# Altium PCB RVM_EF_PCB1.PcbDoc (part 1 of 2)
Units mm, origin at the board's own origin, x right, y up, seen from the top; angles counter-clockwise.
Board outline 100 x 100 mm, 2 copper layers (Top Layer, Bottom Layer); 92 components, 69 nets, 291 pads, 53 vias.
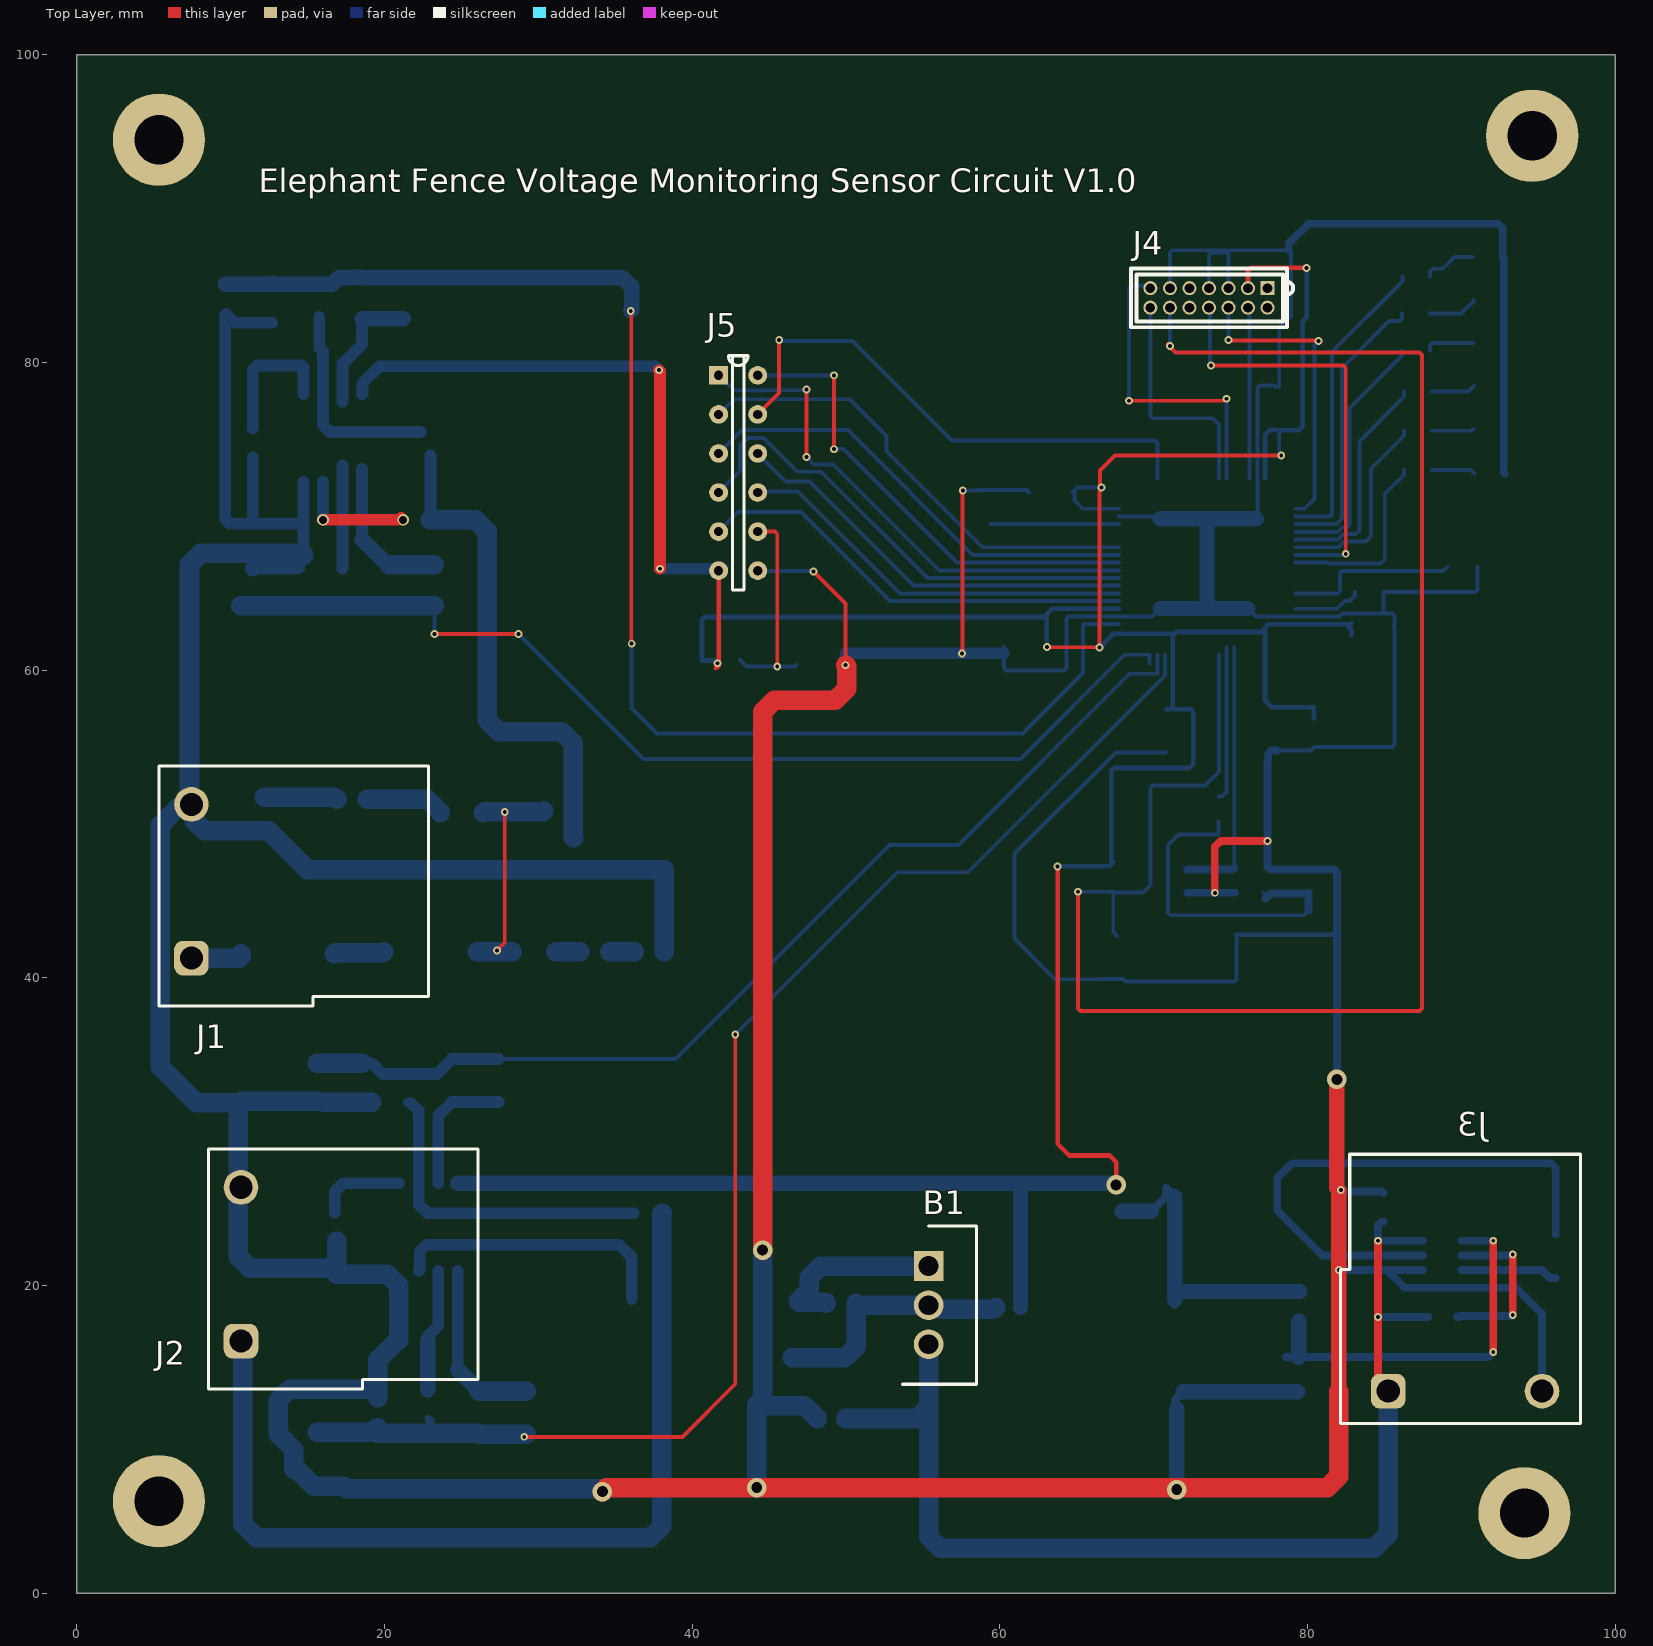
[diagram p0: Top Layer view]
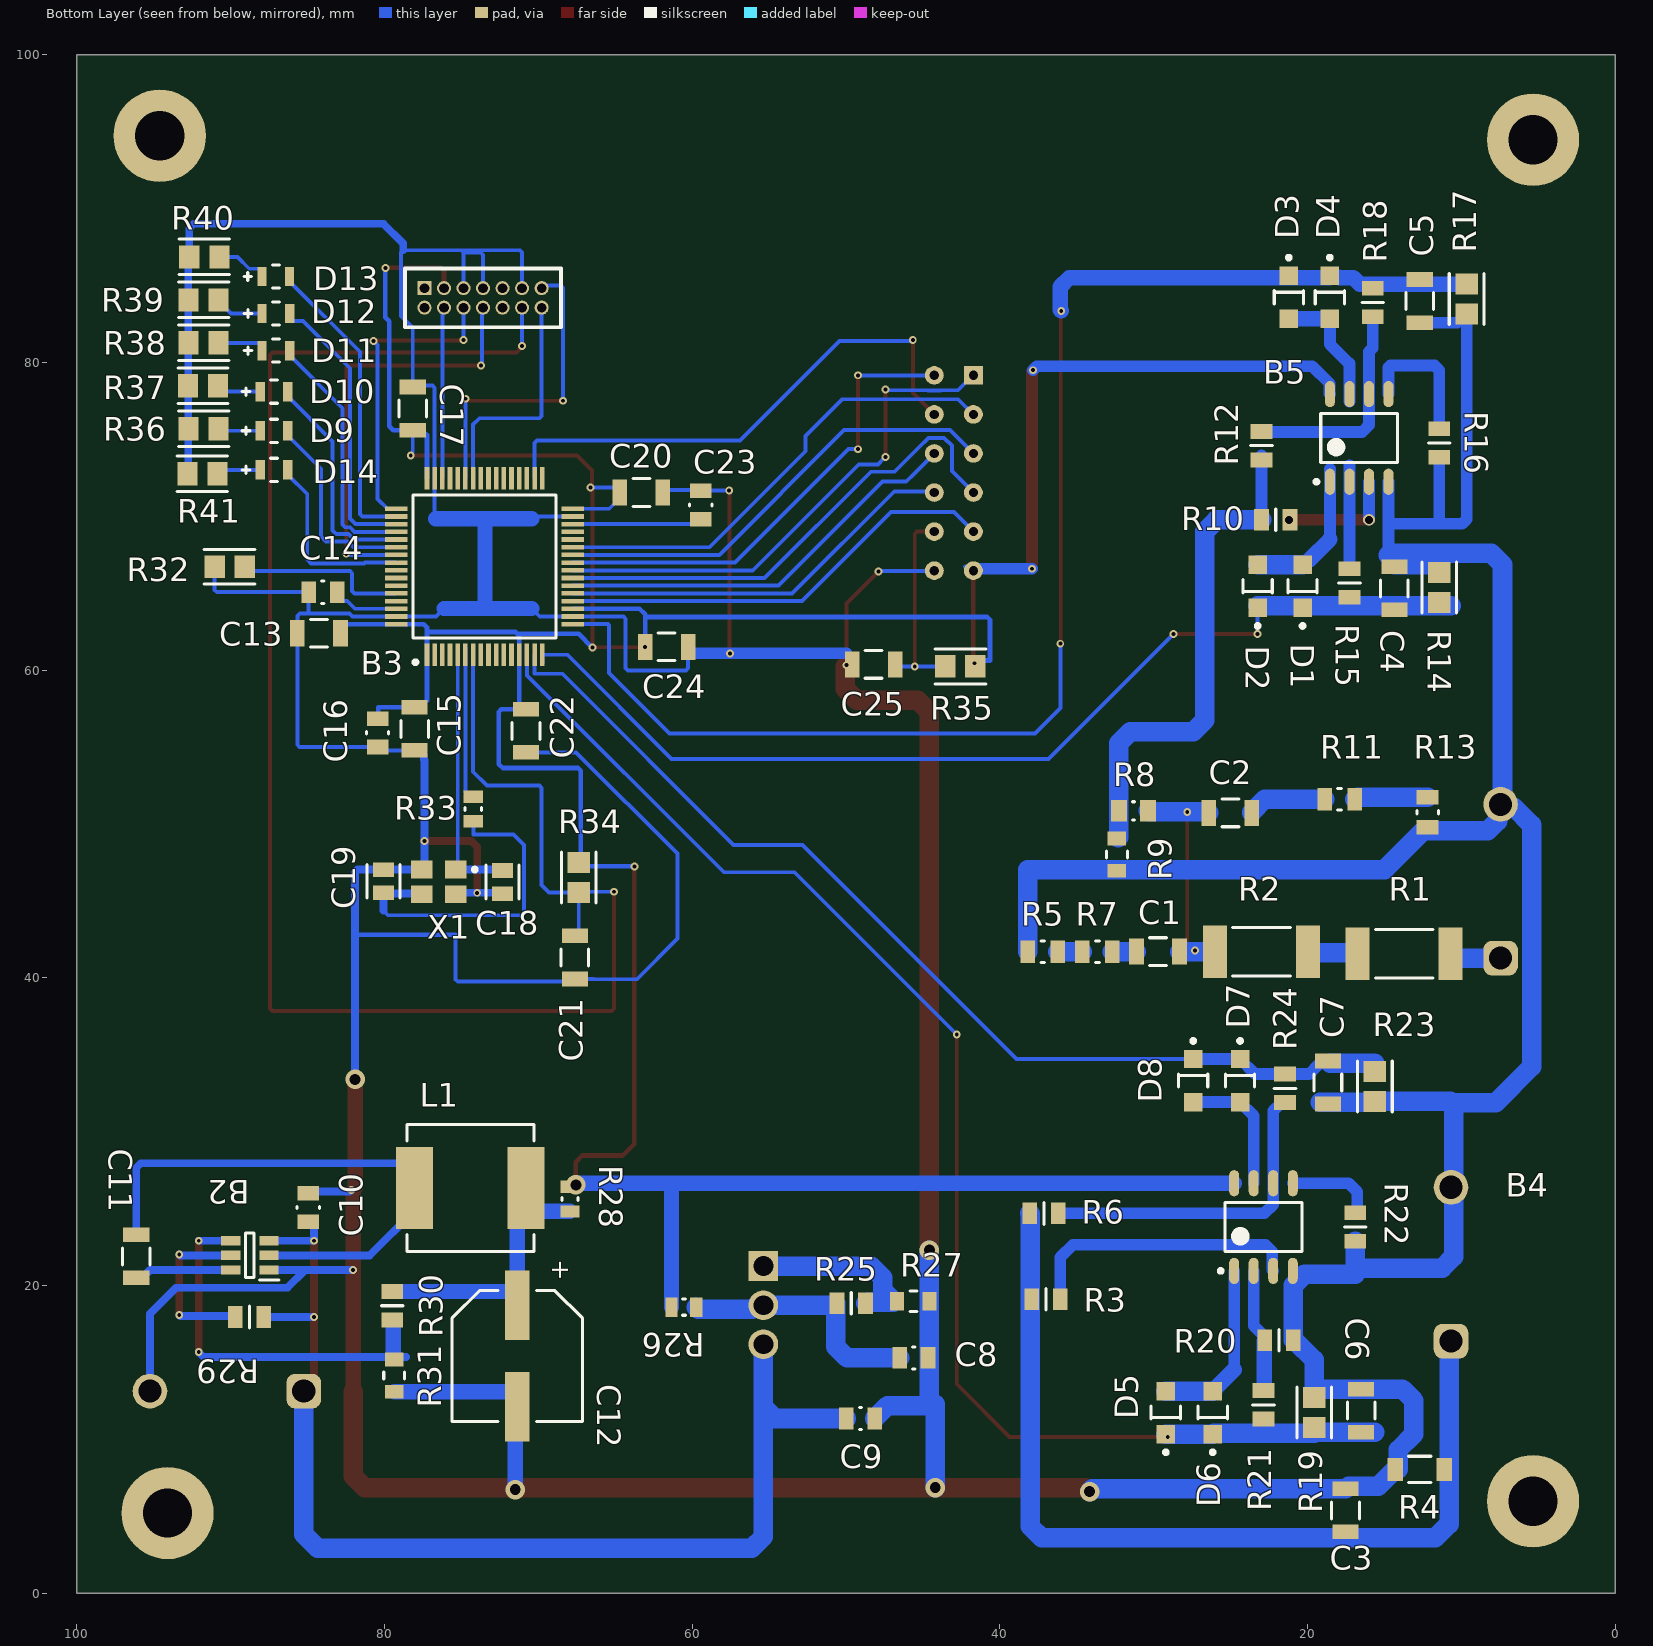
[diagram p1: Bottom Layer view, seen from below]
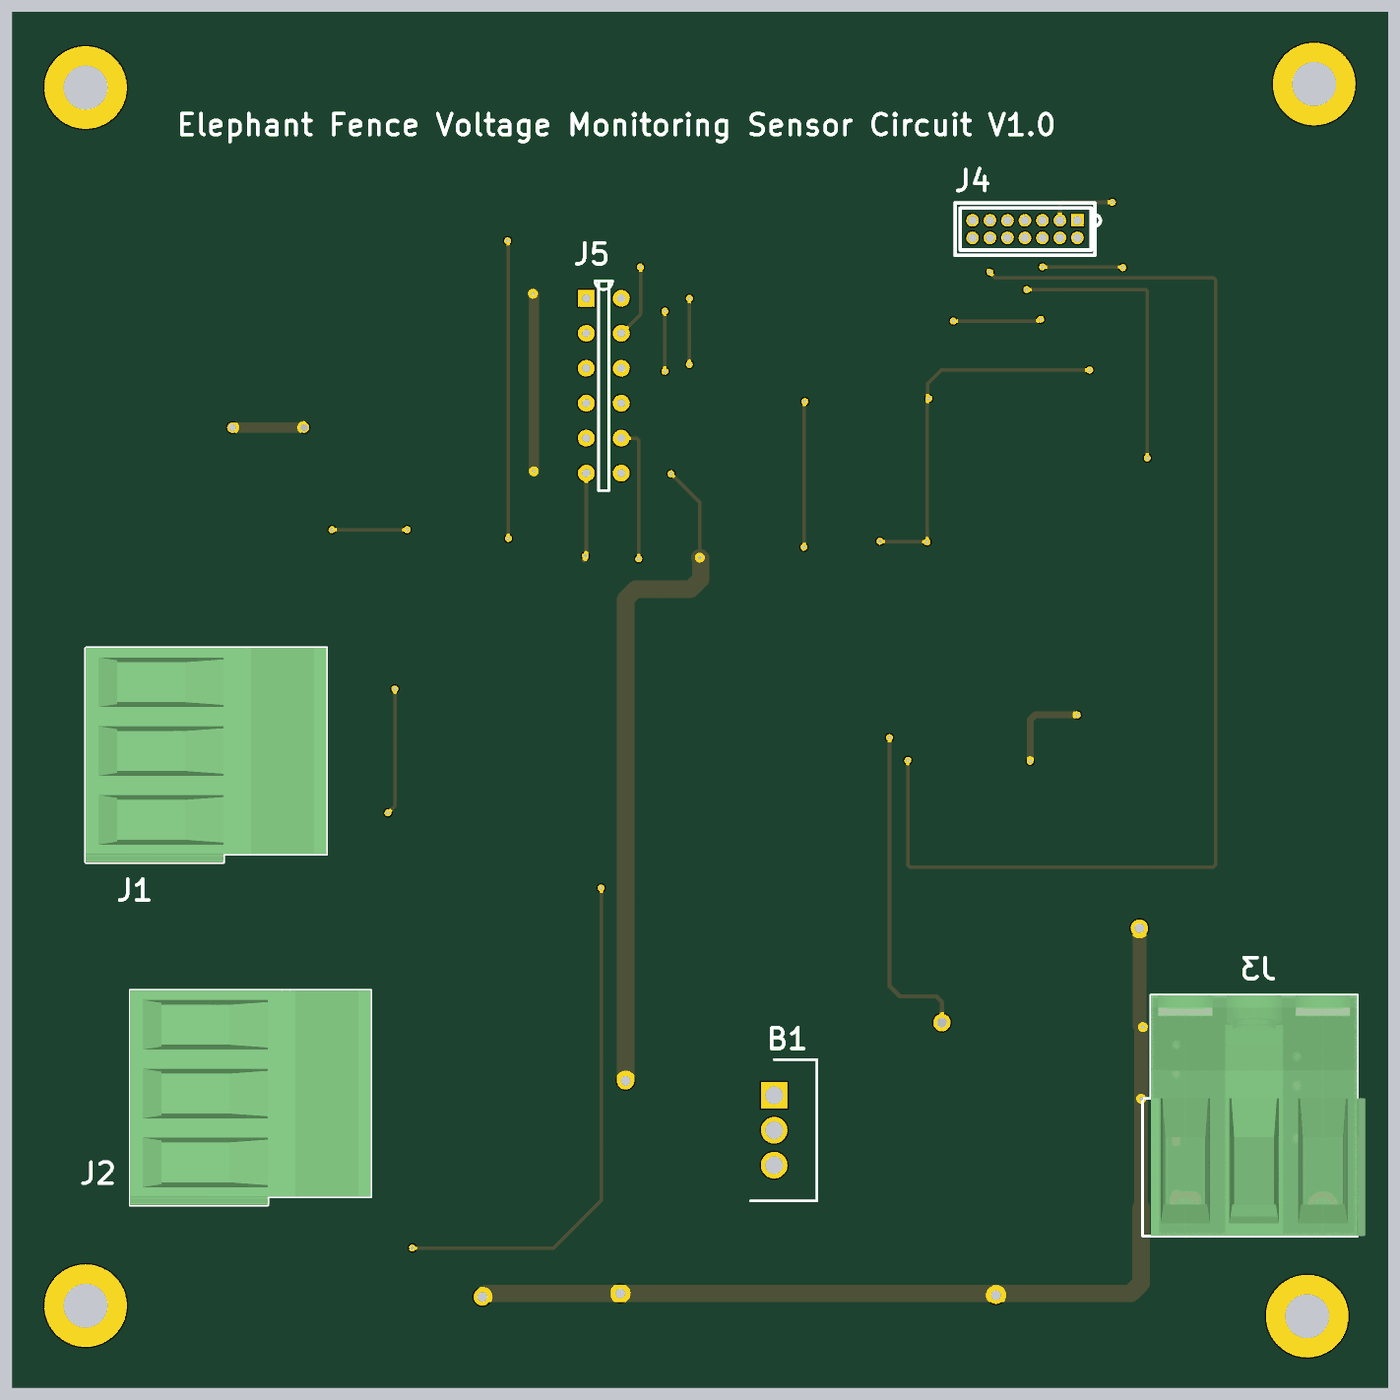
[diagram p2: 3D render of the assembled board from above, using the file's embedded part models]
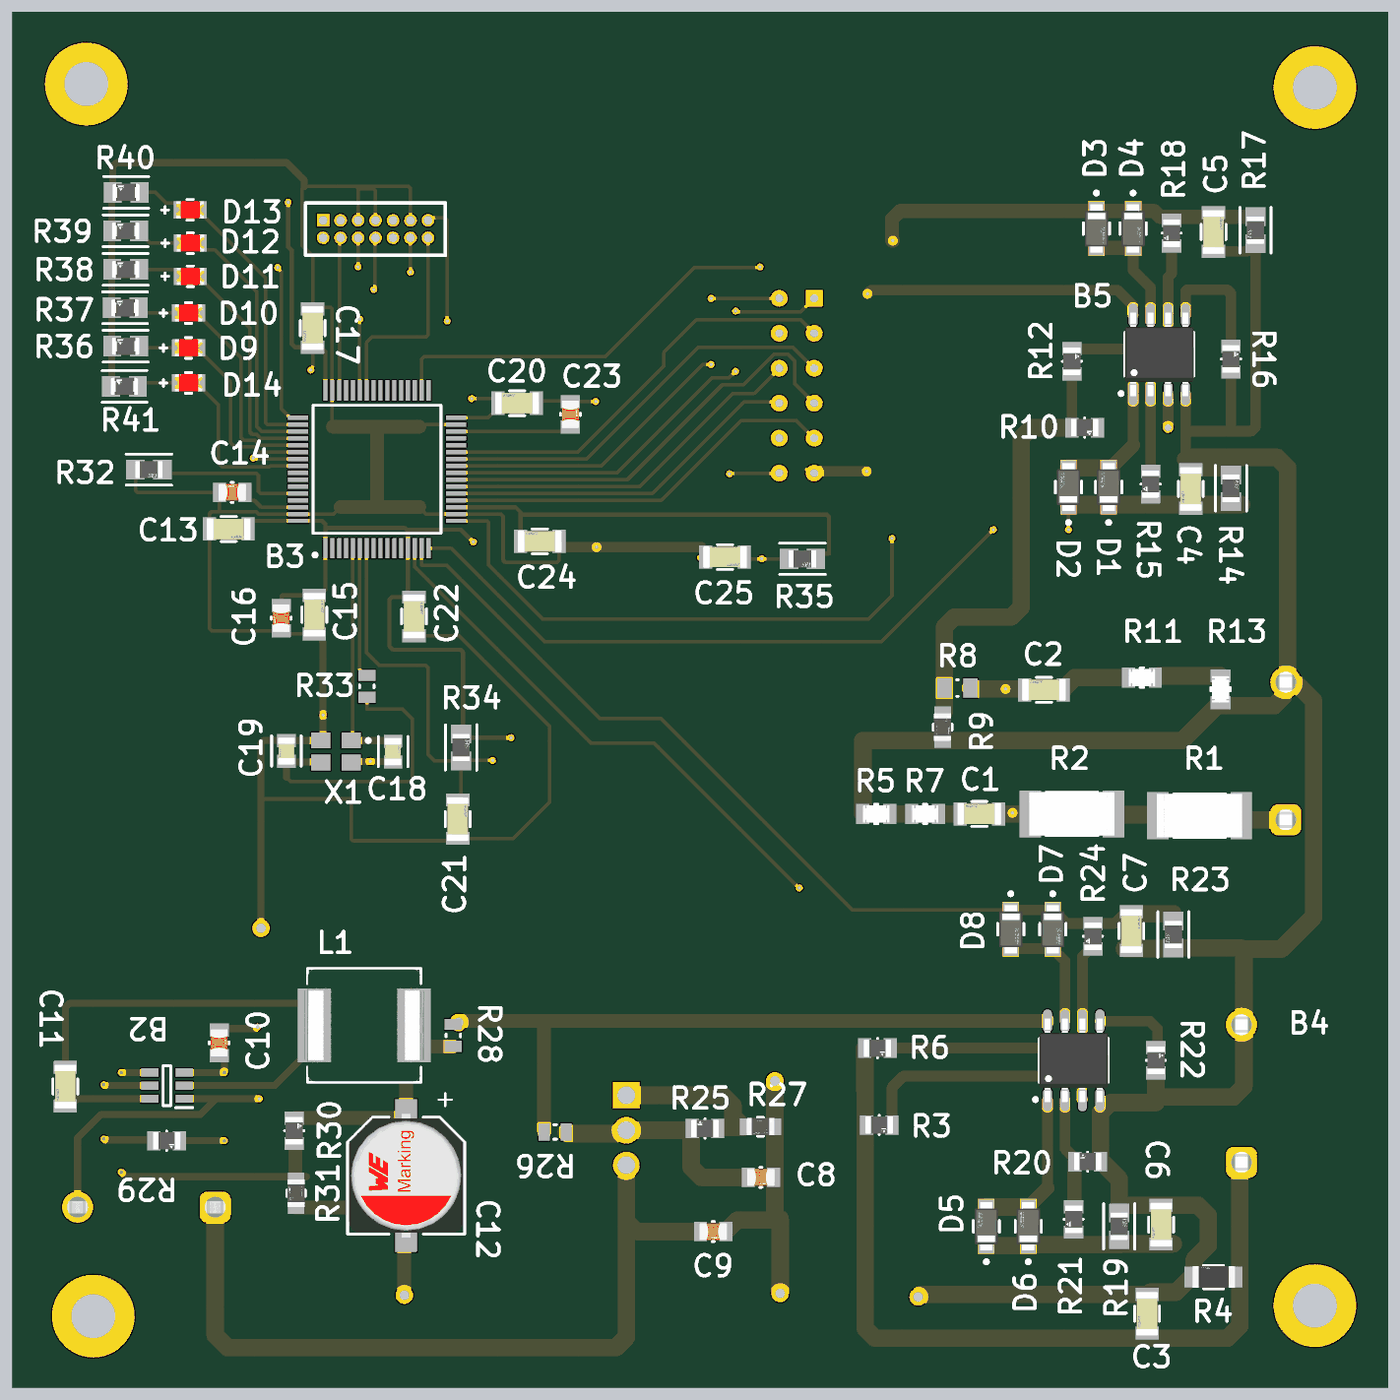
[diagram p3: 3D render of the assembled board from below, using the file's embedded part models]

## Layer stack, top to bottom
Top Solder: solder mask 0.0102, Solder Resist, Dk 3.5
Top Layer: signal copper 0.0356
Dielectric 1: dielectric 0.32, FR-4, Dk 4.8
Bottom Layer: signal copper 0.0356
Bottom Solder: solder mask 0.0102, Solder Resist, Dk 3.5

## Board outline
100,100 0,100 0,0 100,0

## Design rules (kind name [scope] priority, off if disabled: settings)
Clearance Clearance_B2 [HasFootprint('SOT95P280X110-6N')] p1: gap=0.127 ignorepadtopadclearanceinfootprint=FALSE
Clearance Clearance_Tight_Pitch_B3 [HasFootprint('QFP50P1200X1200X160-64N')] p2: gap=0.051 ignorepadtopadclearanceinfootprint=FALSE
Clearance [All] p3: gap=0.254 ignorepadtopadclearanceinfootprint=FALSE except(0.127: Arc-Arc Arc-Track Track-Track)
MinimumSolderMaskSliver [All] p1: minsoldermaskwidth=0.127
PolygonConnect [All] p1: connectstyle=Relief reliefconductorwidth=0.254 reliefentries=4 polygonreliefangle="90 Angle" airgapwidth=0.254
RoutingVias [All] p1: holewidth=0.711 width=1.27 viastyle="Through Hole" minholewidth=0.711 minwidth=1.27 maxholewidth=0.711 maxwidth=1.27
SilkToSolderMaskClearance [IsPad] p1: minsilkscreentomaskgap=0.127 clearancetoexposedcopper=TRUE
SolderMaskExpansion [All] p1: expansion=0.102 istentingtop=FALSE
SupplyNets "Schematic Supply Nets_1" [InNet('GND')] p1: voltage=0.000
SupplyNets "Schematic Supply Nets" [InNet('+3V3')] p2: voltage=0.000
Width [All] p1: maxlimit=1.27 minlimit=0.127 preferedwidth=0.508 minimp=50.000000 maximp=50.000000 favimp=50.000000
28 further rules are at their usual default settings.

## Classes and differential pairs
component class U_LED_blink: D9 D10 D11 D12 D13 D14 R36 R37 R38 R39 R40 R41

## Components (designator, comment, footprint, x,y, rotation, side; value= is the part's Value field where it differs from the comment)
B1 "LM317MBTG" TO254P482X997X2018-3P 55.372,21.257 r270 top
B2 "LMR51430YDDCR" SOT95P280X110-6N 88.753,21.958 r0 bottom
B3 "STM32H503RBT7" QFP50P1200X1200X160-64N 73.492,66.743 r90 bottom
B4 "TLV9002IDGKT" SOIC127P610X140-8M 22.86,23.797 r90 bottom
B5 "TLV9002IDGKT" SOIC127P610X140-8M 16.637,75.099 r90 bottom
C1 "C1206C104F3GACTU" FP-C1206C-EB-MFG 29.718,41.704 r180 bottom value="0.10 μF"
C2 "C1206C104F3GACTU" FP-C1206C-EB-MFG 25.019,50.721 r180 bottom value="0.10 μF"
C3 "C1206C104F3GACTU" FP-C1206C-EB-MFG 17.526,5.382 r90 bottom value="0.10 μF"
C4 "C1206C104F3GACTU" FP-C1206C-EB-MFG 14.351,65.323 r90 bottom value="0.10 μF"
C5 "C1206C104F3GACTU" FP-C1206C-EB-MFG 12.7,83.995 r270 bottom value="0.10 μF"
C6 "C1206C104F3GACTU" FP-C1206C-EB-MFG 16.51,11.859 r90 bottom value="0.10 μF"
C7 "C1206C104F3GACTU" FP-C1206C-EB-MFG 18.669,33.195 r270 bottom value="0.10 μF"
C8 "CC0805KKX7R9BB225" FP-CC0805-0_85-MFG 45.593,15.288 r180 bottom value="2.2 uF"
C9 "CC0805KKX7R9BB225" FP-CC0805-0_85-MFG 49.058,11.351 r180 bottom value="2.2 uF"
C10 "CC0805KKX7R9BB225" FP-CC0805-0_85-MFG 84.963,25.067 r90 bottom value="2.2 uF"
C11 "C1206C104F3GACTU" FP-C1206C-EB-MFG 96.139,21.892 r90 bottom value="0.10 μF"
C12 "865090449009" WCAP-ASLU_D8H6.5 71.374,15.415 r90 bottom
C13 "C1206C104F3GACTU" FP-C1206C-EB-MFG 84.264,62.405 r0 bottom value="0.10 μF"
C14 "CC0805KKX7R9BB225" FP-CC0805-0_85-MFG 84.01,65.072 r0 bottom value="2.2 uF"
C15 "C1206C104F3GACTU" FP-C1206C-EB-MFG 78.041,56.182 r270 bottom value="0.10 μF"
C16 "CC0805KKX7R9BB225" FP-CC0805-0_85-MFG 80.454,55.928 r270 bottom value="2.2 uF"
C17 "C1206C104F3GACTU" FP-C1206C-EB-MFG 78.168,77.01 r90 bottom value="0.10 μF"
C18 "C0805C100JAGACTU" FP-C0805C-DN-MFG 72.326,46.228 r270 bottom value="10 pF"
C19 "C0805C100JAGACTU" FP-C0805C-DN-MFG 80.073,46.276 r90 bottom value="10 pF"
C20 "C1206C104F3GACTU" FP-C1206C-EB-MFG 63.309,71.549 r180 bottom value="0.10 μF"
C21 "C1206C104F3GACTU" FP-C1206C-EB-MFG 67.627,41.323 r270 bottom value="0.10 μF"
C22 "C1206C104F3GACTU" FP-C1206C-EB-MFG 70.802,56.055 r270 bottom value="0.10 μF"
C23 "CC0805KKX7R9BB225" FP-CC0805-0_85-MFG 59.436,70.739 r90 bottom value="2.2 uF"
C24 "C1206C104F3GACTU" FP-C1206C-EB-MFG 61.658,61.516 r180 bottom value="0.10 μF"
C25 "C1206C104F3GACTU" FP-C1206C-EB-MFG 48.199,60.373 r0 bottom value="0.10 μF"
D1 "PMEG3010BER,115" FP-SOD123W-MFG 20.32,65.453 r90 bottom value=170pF
D2 "PMEG3010BER,115" FP-SOD123W-MFG 23.241,65.453 r90 bottom value=170pF
D3 "PMEG3010BER,115" FP-SOD123W-MFG 21.209,84.246 r270 bottom value=170pF
D4 "PMEG3010BER,115" FP-SOD123W-MFG 18.542,84.246 r270 bottom value=170pF
D5 "PMEG3010BER,115" FP-SOD123W-MFG 29.21,11.732 r90 bottom value=170pF
D6 "PMEG3010BER,115" FP-SOD123W-MFG 26.162,11.732 r90 bottom value=170pF
D7 "PMEG3010BER,115" FP-SOD123W-MFG 24.384,33.322 r270 bottom value=170pF
D8 "PMEG3010BER,115" FP-SOD123W-MFG 27.432,33.322 r270 bottom value=170pF
D9 "SML-LX0805SRC-TR" FP-SML-LX0805SRC-TR-MFG 87.185,75.565 r180 bottom
D10 "SML-LX0805SRC-TR" FP-SML-LX0805SRC-TR-MFG 87.185,78.105 r180 bottom
D11 "SML-LX0805SRC-TR" FP-SML-LX0805SRC-TR-MFG 87.058,80.772 r180 bottom
D12 "SML-LX0805SRC-TR" FP-SML-LX0805SRC-TR-MFG 87.058,83.185 r180 bottom
D13 "SML-LX0805SRC-TR" FP-SML-LX0805SRC-TR-MFG 87.069,85.598 r180 bottom
D14 "SML-LX0805SRC-TR" FP-SML-LX0805SRC-TR-MFG 87.185,73.025 r180 bottom
J1 "691252800002" 691252800002#1 14.097,46.276 r90 top
J2 "691252800002" 691252800002#1 17.318,21.383 r90 top
J3 "691252800002" 691252800002#2 90.25,19.779 r0 top
J4 "STDC-14 Conntector STM32" DIP14 77.406,84.836 r270 top
J5 "Component_1" DIP12-LoRa-Wireless-Maodule 41.719,79.169 r0 top
L1 "IHLP3232CZER5R6M01" FP-IHLP-3232CZ-FP_2_413x5-MFG 74.422,26.337 r0 bottom
R1 "CRCW251210M0FKEH" FP-CRCW2512-e3-IPC_A 13.716,41.577 r0 bottom
R2 "CRCW251210M0FKEH" FP-CRCW2512-e3-IPC_A 22.987,41.704 r0 bottom
R3 "MCU08050D1003BP500" FP-MCU0805-IPC_B 36.995,19.098 r180 bottom
R4 "RT1206FRE0747RL" FP-RT1206-MFG 12.7,8.049 r0 bottom value=47Ω
R5 "CRCW080510M0FKEC" FP-CRCW0805-e3-MFG 37.211,41.704 r0 bottom
R6 "MCU08050D1003BP500" FP-MCU0805-IPC_B 37.122,24.686 r180 bottom
R7 "CRCW080510M0FKEC" FP-CRCW0805-e3-MFG 33.655,41.704 r0 bottom
R8 "1M 1% 0805(2012)" RESC0805(2012)_N 31.308,50.848 r0 bottom value=1MR
R9 "RT0805DRD073K9L" FP-RT0805-MFG 32.385,48.006 r270 bottom value=3.9KΩ
R10 "MCU08050D1003BP500" FP-MCU0805-IPC_B 22.06,69.771 r180 bottom
R11 "CRCW080510M0FKEC" FP-CRCW0805-e3-MFG 17.907,51.61 r0 bottom
R12 "MCU08050D1003BP500" FP-MCU0805-IPC_B 22.987,74.597 r90 bottom
R13 "CRCW080510M0FKEC" FP-CRCW0805-e3-MFG 12.192,50.762 r90 bottom
R14 "RMCF0805FT1M00" FP-RMCF0805-IPC_A 11.43,65.366 r90 bottom
R15 "MCU08050D1003BP500" FP-MCU0805-IPC_B 17.272,65.669 r270 bottom
R16 "MCU08050D1003BP500" FP-MCU0805-IPC_B 11.43,74.762 r90 bottom
R17 "RMCF0805FT1M00" FP-RMCF0805-IPC_A 9.652,84.122 r270 bottom
R18 "MCU08050D1003BP500" FP-MCU0805-IPC_B 15.748,83.906 r270 bottom
R19 "RMCF0805FT1M00" FP-RMCF0805-IPC_A 19.558,11.732 r90 bottom
R20 "MCU08050D1003BP500" FP-MCU0805-IPC_B 21.844,16.431 r0 bottom
R21 "MCU08050D1003BP500" FP-MCU0805-IPC_B 22.86,12.24 r270 bottom
R22 "MCU08050D1003BP500" FP-MCU0805-IPC_B 16.891,23.797 r90 bottom
R23 "RMCF0805FT1M00" FP-RMCF0805-IPC_A 15.621,32.941 r270 bottom
R24 "MCU08050D1003BP500" FP-MCU0805-IPC_B 21.463,32.814 r270 bottom
R25 "MCU08050D1003BP500" FP-MCU0805-IPC_B 49.657,18.844 r0 bottom
R26 "RC0805JR-130RL" RESC2013X60X35LL10T20 60.541,18.59 r180 bottom value=0R
R27 "RT0805WRD0722K6L" FP-RT0805-MFG 45.627,18.971 r0 bottom value=22.6KΩ
R28 "RC0805JR-130RL" RESC2013X60X35LL10T20 67.945,25.613 r90 bottom value=0R
R29 "MCU08050D1003BP500" FP-MCU0805-IPC_B 88.773,17.955 r180 bottom
R30 "MCU08050D1003BP500" FP-MCU0805-IPC_B 79.502,18.679 r90 bottom
R31 "RT0805WRD0722K6L" FP-RT0805-MFG 79.375,14.145 r90 bottom value=22.6KΩ
R32 "RMCF0805FG10K0" FP-RMCF0805-IPC_A 90.066,66.723 r180 bottom
R33 "RC0805JR-130RL" RESC2013X60X35LL10T20 74.231,50.975 r270 bottom value=0R
R34 "RMCF0805FG10K0" FP-RMCF0805-IPC_A 67.373,46.53 r90 bottom
R35 "RMCF0805FG10K0" FP-RMCF0805-IPC_A 42.568,60.246 r180 bottom
R36 "CRCW0805300RFKEAHP" FP-CRCW0805-HPe3-IPC_A 91.757,75.692 r180 bottom
R37 "CRCW0805300RFKEAHP" FP-CRCW0805-HPe3-IPC_A 91.797,78.486 r180 bottom
R38 "CRCW0805300RFKEAHP" FP-CRCW0805-HPe3-IPC_A 91.757,81.28 r180 bottom
R39 "CRCW0805300RFKEAHP" FP-CRCW0805-HPe3-IPC_A 91.757,84.074 r180 bottom
R40 "CRCW0805300RFKEAHP" FP-CRCW0805-HPe3-IPC_A 91.718,86.868 r180 bottom
R41 "CRCW0805300RFKEAHP" FP-CRCW0805-HPe3-IPC_A 91.845,72.771 r180 bottom
X1 "TSX-3225 16.0000MF09Z-AC3" EPSON-TSX-3225_V 76.475,46.238 r0 bottom

## Footprints (in the part's own frame and the unit in brackets; to place one, negate y for a bottom-side part, rotate by r counter-clockwise, add the part's x,y. Pads: shape width x height; smd on the part's side, far side on the other; paste and mask are expansions set on the pad)
691252800002#1 [mm] "Serie 2528-10mm Vertical Cable Entry, 02p"
  rrect50% 2.25x2.25 hole 1.5: 1(-5,6.65)
  round 2.25 hole 1.5: 2(5,6.65)
  silkscreen extent -8.1,-8.75 7.5,8.75, body extent -8.1,-8.75 7.5,8.75, height 16.1
691252800002#2 [mm] "Serie 2528-10mm Vertical Cable Entry, 02p"
  rrect50% 2.25x2.25 hole 1.5: 1(-5,-6.65)
  round 2.25 hole 1.5: 2(5,-6.65)
  silkscreen extent -8.1,-8.75 7.5,8.75, body extent -7.5,-8.75 8.1,8.75, height 16.1
DIP12-LoRa-Wireless-Maodule [mm]
  rect 1.23x1.2 hole 0.6: 1(0,0)
  oval 1.23x1.2 hole 0.6: 2(0,-2.54) 3(0,-5.08) 4(0,-7.62) 5(0,-10.16) 6(0,-12.7) 7(2.54,-12.7) 8(2.54,-10.16) 9(2.54,-7.62) 10(2.54,-5.08) 11(2.54,-2.54) 12(2.54,0)
  silkscreen extent 0.64,-13.97 1.91,1.27
DIP14 [mil]
  rect 36x36 hole 25: 1(0,0)
  round 36 hole 25: 2(50,0) 3(0,-50) 4(50,-50) 5(0,-100) 6(50,-100) 7(0,-150) 8(50,-150) 9(0,-200) 10(50,-200) 11(0,-250) 12(50,-250) 13(0,-300) 14(50,-300)
  silkscreen extent -50,-350 100,66
EPSON-TSX-3225_V [mm] "SMD, 4-Leads, Body 3.2x2.5mm"
  rect 1.4x1.15 smd: 1(-1.1,-0.8) 2(1.1,-0.8) 3(1.1,0.8) 4(-1.1,0.8)
  silkscreen extent -2.47,-0.92 -2.22,-0.68, body extent -1.6,-1.25 1.6,1.25, height 0.6
FP-C0805C-DN-MFG [mm]
  rect 0.95x1.35 smd paste+0 mask+0: 1(-0.75,0) 2(0.75,0)
  silkscreen extent -1.1,-1.07 1.1,1.07, body extent -1,-0.63 1,0.63, height 0.88
FP-C1206C-EB-MFG [mm]
  rect 0.95x1.7 smd paste+0 mask+0: 1(-1.4,0) 2(1.4,0)
  silkscreen extent -0.55,-0.9 0.55,0.9, body extent -1.6,-0.8 1.6,0.8, height 0.88
FP-CC0805-0_85-MFG [mm]
  rect 0.95x1.4 smd paste+0 mask+0: 1(-0.925,0) 2(0.925,0)
  silkscreen extent -0.07,-0.73 0.07,0.73, body extent -1,-0.63 1,0.63, height 0.95
FP-CRCW0805-e3-MFG [mm]
  rect 0.95x1.45 smd paste+0 mask+0: 1(-0.975,0) 2(0.975,0)
  silkscreen extent -0.13,-0.7 0.13,0.7, body extent -1,-0.63 1,0.63, height 0.5
FP-CRCW0805-HPe3-IPC_A [mm]
  rect 1.306x1.508 smd paste+0 mask+0: 1(-0.976,0) 2(0.976,0)
  silkscreen extent -1.63,-1.15 1.63,1.15, body extent -1,-0.63 1,0.63, height 0.6
FP-CRCW2512-e3-IPC_A [mm]
  rect 1.555x3.408 smd paste+0 mask+0: 1(-3.026,0) 2(3.026,0)
  silkscreen extent -1.87,-1.58 1.87,1.58, body extent -3.15,-1.58 3.15,1.58, height 0.7
FP-IHLP-3232CZ-FP_2_413x5-MFG [mil]
  rect 95x210 smd paste+0 mask+0: 1(-142.5,0) 2(142.5,0)
  silkscreen extent -163,-163 163,163, body extent -170,-161 170,161, height 118
FP-MCU0805-IPC_B [mm]
  rect 0.959x1.408 smd paste+0 mask+0: 1(-0.927,0) 2(0.927,0)
  silkscreen extent 0,-0.7 0,0.7, body extent -1,-0.63 1,0.63, height 0.55
FP-RMCF0805-IPC_A [mm]
  rect 1.355x1.462 smd paste+0 mask+0: 1(-0.976,0) 2(0.976,0)
  silkscreen extent -1.65,-1.13 1.65,1.13, body extent -1,-0.63 1,0.63, height 0.65
FP-RT0805-MFG [mm]
  rect 0.9x1.2 smd paste+0 mask+0: 1(-1.05,0) 2(1.05,0)
  silkscreen extent -0.22,-0.67 0.22,0.67, body extent -1,-0.63 1,0.63, height 0.6
FP-RT1206-MFG [mm]
  rect 1x1.5 smd paste+0 mask+0: 1(-1.6,0) 2(1.6,0)
  silkscreen extent -0.73,-0.85 0.73,0.85, body extent -1.57,-0.8 1.53,0.8, height 0.65
FP-SML-LX0805SRC-TR-MFG [mm]
  rect 0.6x1.25 smd paste+0 mask+0: 1(-0.9,0) 2(0.9,0)
  silkscreen extent -2.07,-0.75 0.22,0.75, body extent -1,-0.63 1.01,0.63, height 1.24
FP-SOD123W-MFG [mm]
  rect 1.2x1.2 smd paste-1000 mask+0: 1(-1.4,0) 2(1.4,0)
  silkscreen extent -2.7,-0.95 0.42,0.95, body extent -1.75,-0.85 1.75,0.85, height 1.1
QFP50P1200X1200X160-64N [mm]
  rect 1.475x0.3 smd: 1(-5.738,3.75) 2(-5.738,3.25) 3(-5.738,2.75) 4(-5.738,2.25) 5(-5.738,1.75) 6(-5.738,1.25) 7(-5.738,0.75) 8(-5.738,0.25) 9(-5.738,-0.25) 10(-5.738,-0.75) 11(-5.738,-1.25) 12(-5.738,-1.75) 13(-5.738,-2.25) 14(-5.738,-2.75) 15(-5.738,-3.25) 16(-5.738,-3.75) 33(5.738,-3.75) 34(5.738,-3.25) 35(5.738,-2.75) 36(5.738,-2.25) 37(5.738,-1.75) 38(5.738,-1.25) 39(5.738,-0.75) 40(5.738,-0.25) 41(5.738,0.25) 42(5.738,0.75) 43(5.738,1.25) 44(5.738,1.75) 45(5.738,2.25) 46(5.738,2.75) 47(5.738,3.25) 48(5.738,3.75)
  rect 0.3x1.475 smd: 17(-3.75,-5.738) 18(-3.25,-5.738) 19(-2.75,-5.738) 20(-2.25,-5.738) 21(-1.75,-5.738) 22(-1.25,-5.738) 23(-0.75,-5.738) 24(-0.25,-5.738) 25(0.25,-5.738) 26(0.75,-5.738) 27(1.25,-5.738) 28(1.75,-5.738) 29(2.25,-5.738) 30(2.75,-5.738) 31(3.25,-5.738) 32(3.75,-5.738) 49(3.75,5.738) 50(3.25,5.738) 51(2.75,5.738) 52(2.25,5.738) 53(1.75,5.738) 54(1.25,5.738) 55(0.75,5.738) 56(0.25,5.738) 57(-0.25,5.738) 58(-0.75,5.738) 59(-1.25,5.738) 60(-1.75,5.738) 61(-2.25,5.738) 62(-2.75,5.738) 63(-3.25,5.738) 64(-3.75,5.738)
  silkscreen extent -6.35,-4.65 4.65,4.65
RESC0805(2012)_N [mm] "Chip Resistor, Body 2.0x1.3mm, IPC Medium Density"
  rect 1.05x1.4 smd: 1(-0.95,0) 2(0.95,0)
  silkscreen extent -0.05,-0.6 0.05,0.6, body extent -1.1,-0.67 1.1,0.68, height 0.7
RESC2013X60X35LL10T20 [mm] "Chip Resistor, 2-Leads, Body 2.00x1.25mm, IPC High Density"
  rect 0.8x1.25 smd: 1(-0.8,0) 2(0.8,0)
  silkscreen extent -0.1,-0.53 0.1,0.53, body extent -1.05,-0.67 1.05,0.67, height 0.6
SOIC127P610X140-8M [mm] "SOIC, 8-Leads, Body 4.95x3.95mm, Pitch 1.27mm, IPC Low Density"
  oval 1.7x0.65 smd: 1(-2.85,1.905) 2(-2.85,0.635) 3(-2.85,-0.635) 4(-2.85,-1.905) 5(2.85,-1.905) 6(2.85,-0.635) 7(2.85,0.635) 8(2.85,1.905)
  silkscreen extent -2.97,-2.5 1.6,2.91, body extent -3.05,-2.5 3.05,2.5, height 1.4
SOT95P280X110-6N [mm]
  rect 1.25x0.6 smd: 1(-1.25,0.95) 2(-1.25,0) 3(-1.25,-0.95) 4(1.25,-0.95) 5(1.25,0) 6(1.25,0.95)
  silkscreen extent -1.87,-1.45 0.28,1.6
TO254P482X997X2018-3P [mm]
  rect 1.935x1.935 / inner round 1.935 / far side rect 1.935x1.935 hole 1.29: 1(0,0)
  round 1.935 hole 1.29: 2(2.54,0) 3(5.08,0)
  silkscreen extent -2.6,-1.71 7.68,3.11
WCAP-ASLU_D8H6.5 [mm] "Aluminum Electrolytic Capacitors, body diameter 8mm"
  rect 4.5x1.6 smd: 1(3.3,0) 2(-3.3,0)
  silkscreen extent -4.25,-4.25 4.25,4.25, body extent -4.5,-4.15 4.5,4.15, height 6.49

## Part data
B1: "Internal Short Circuit Current Limiting; Internal Thermal Overload Protection; Output Current in Excess of 500 mA; Output Transistor Safe-Area Compensation; Output Adjustable between 1.2 V and 37 V; Floating Operation for High Voltage Applications; Eliminates Stocking Many Fixed Voltages; Pb-Free Packages are Available; NCV Prefix for Automotive and Other Applications Requiring Site Control Changes", Manufacturer_Name=onsemi, Mouser Part Number=863-LM317MBTG, Datasheet Link=https://www.onsemi.com/pub/Collateral/LM317M-D.PDF, Geometry.Height=4.82mm, Manufacturer_Part_Number=LM317MBTG, Mouser Price/Stock=https://www.mouser.co.uk/ProductDetail/onsemi/LM317MBTG?qs=2OtswVQKCOHWWQM%252BNYhxOw%3D%3D
B2: "Switching Voltage Regulators SIMPLE SWITCHER&reg; 4.5-V to 36-V, 3-A synchronous buck converter with 40-&micro;A IQ", Manufacturer_Name="Texas Instruments", Mouser Part Number=595-LMR51430YDDCR, Datasheet Link=https://www.ti.com/lit/ds/symlink/lmr51430.pdf?ts=1657817980313&ref_url=https%253A%252F%252Fwww.ti.com%252Fproduct%252FLMR51430%253FkeyMatch%253DLMR51430%2526tisearch%253Dsearch-everything%2526usecase%253DGPN, Geometry.Height=1.1mm, Manufacturer_Part_Number=LMR51430YDDCR, Mouser Price/Stock=https://www.mouser.co.uk/ProductDetail/Texas-Instruments/LMR51430YDDCR?qs=vvQtp7zwQdMdLcsY5sFiMg%3D%3D
B3: "Arm Cortex-M33 32-bit MCU+FPU, 375 DMIPS, 250 MHz, 128 Kbytes flash memory, 32 Kbytes RAM, I3C", Manufacturer_Name=STMicroelectronics, Mouser Part Number=511-STM32H503RBT7, Datasheet Link=https://www.st.com/resource/en/datasheet/stm32h503eb.pdf, Geometry.Height=1.6mm, Manufacturer_Part_Number=STM32H503RBT7, Mouser Price/Stock=https://www.mouser.co.uk/ProductDetail/STMicroelectronics/STM32H503RBT7?qs=Z%252BL2brAPG1Lgew3845jGyA%3D%3D
B4 B5: "2-Channel, 1MHz, RRIO, 1.8V to 5.5V Operational Amplifier for Cost-Optimized Systems", Manufacturer_Name="Texas Instruments", Mouser Part Number=595-TLV9002IDGKT, Datasheet Link=https://www.ti.com/lit/ds/symlink/tlv9002.pdf?ts=1635497933449, Geometry.Height=1.1mm, Manufacturer_Part_Number=TLV9002IDGKT, Mouser Price/Stock=https://www.mouser.co.uk/ProductDetail/Texas-Instruments/TLV9002IDGKT?qs=wUXugUrL1qxkc8vIM2YvZQ%3D%3D
C1 C2 C3 C4 C5 C6 C7 C11 C13 C15 C17 C20 C21 C22 C24 C25: library part CMP-1037-04186-2, "CAP CER 0.1UF 25V C0G/NP0 1206", Capacitance="0.10 μF", Manufacturer=KEMET, Package=C1206C-EB, Temperature="-55°C to +150°C", Temperature Characteristic=C0G, Temperature Coefficient=15%, Temperature Range High=+150°C, Temperature Range Low=-55°C, Tolerance=0.01, Voltage Rating="25 V", Automotive=Yes, Automotive Grade="Grade 0", Category=Cap, ComponentLink2Description=Datasheet, ComponentLink2URL=https://content.kemet.com/datasheets/KEM_C1007_X8R_ULTRA_150C_SMD.pdf, Device Class L1="Passive Components", Device Class L2=Capacitors, Device Class L3="Ceramic Capacitors", Digikey Description="CAP CER 0.1UF 25V C0G/NP0 1206", Height=0.88mm, Ipc Land Pattern Name=CAPC320160X78, Lead Free=Yes, Manufacturer Part Number=C1206C104F3GACTU, Material=Ceramic, Mouser Description="Multilayer Ceramic Capacitors MLCC - SMD/SMT 25volts 0.1uF 1% C0G", Octopart=https://octopart.com/c1206c104f3gactu-kemet-13149870, RoHS=TRUE
C8 C9 C10 C14 C16 C23: library part CMP-03422-001390-1, "CAP CER 2.2UF 50V X7R 0805", Capacitance="2.2 uF", Manufacturer=Yageo, Package=CC0805-0.85, Temperature="-30°C to +85°C", Temperature Characteristic=X7R, Temperature Range High=+85°C, Temperature Range Low=-30°C, Tolerance=0.1, Voltage Rating="50 V", Automotive=No, Category=Cap, ComponentLink2Description=Datasheet, ComponentLink2URL=http://www.yageo.com/documents/recent/UPY-GPHC_Y5V_6.3V-to-50V_8.pdf, Device Class L1="Passive Components", Device Class L2=Capacitors, Device Class L3="Ceramic Capacitors", Digikey Description="CAP CER 2.2UF 50V X7R 0805", Footprint Url=http://www.yageo.com/exep/pages/download/literatures/UPY-C_GEN_24.pdf, Height=0.95mm, Ipc Land Pattern Name=CAPC200125X85, Lead Free=Yes, Manufacturer Part Number=CC0805KKX7R9BB225, Material=Ceramic, Mouser Description="0805 50 V 2.2 uF ±10% Tolerance X7R Multilayer Ceramic Capacitor", Octopart=https://octopart.com/cc0805kkx7r9bb225-yageo-51849248, RoHS=TRUE
C12: library part CMP-03913-54202517-2, "WCAP-ASLU Aluminum Electrolytic Capacitors", Capacitance=100µF, Case/Package=Radial, Insulation Resistance=1MΩ, Leakage Current=5µA, Max Operating Temperature=85°C, Min Operating Temperature=-40°C, Ripple Current=110mA, Tolerance=20%, Voltage Rating=25V, Diameter=8mm, Height=6.5mm, Height - Seated (Max)=6.5024mm, Length=6.5mm, Life (Hours)=1000hours, Mount="Surface Mount", Polarity=Polar, REACH SVHC=Unknown, Ripple Current (AC)=110mA, RoHS=Compliant, Voltage Rating (DC)=25V, Width=8.3mm
C18 C19: library part CMP-03020-028919-1, "C0805 10 pF C0G 30ppm/°C 5.00% 250 V", Capacitance="10 pF", Manufacturer=KEMET, Package=C0805C-DN, Temperature="-55°C to +125°C", Temperature Characteristic=C0G, Temperature Coefficient=30ppm/°C, Temperature Range High=+125°C, Temperature Range Low=-55°C, Tolerance=0.05, Voltage Rating="250 V", Automotive=No, Category=Cap, ComponentLink2Description=Datasheet, ComponentLink2URL=https://content.kemet.com/datasheets/KEM_C1003_C0G_SMD.pdf, Device Class L1="Passive Components", Device Class L2=Capacitors, Device Class L3="Ceramic Capacitors", Height=0.88mm, Ipc Land Pattern Name=CAPC200125X78, Lead Free=Yes, Manufacturer Part Number=C0805C100JAGACTU, Material=Ceramic, Octopart=https://octopart.com/c0805c100jagactu-kemet-88373098, RoHS=TRUE
D1 D2 D3 D4 D5 D6 D7 D8: library part CMP-14398-000004-1, "DIODE SCHOTTKY 30V 1A SOD123W", Ambient Temperature Range High=+150°C, Ambient Temperature Range Low=-55°C, Capacitance=170pF, Forward Current=1A, Manufacturer=Nexperia, Max Surge Forward Current=50A, Package=SOD123W, Peak Reverse Current=15uA, Reverse Voltage=30V, Temperature="to +150°C", Automotive=Yes, Automotive Grade="Grade 0", Category=Diode, ComponentLink2Description=Datasheet, ComponentLink2URL=https://assets.nexperia.com/documents/data-sheet/PMEG3010BER.pdf, Device Class L1="Discrete Semiconductors", Device Class L2=Diodes, Device Class L3="Schottky Diodes", Digikey Description="DIODE SCHOTTKY 30V 1A SOD123W", Footprint Url=https://assets.nexperia.com/documents/outline-drawing/SOD123W.pdf, Height=1.1mm, Lead Free=Yes, Manufacturer Part Number=PMEG3010BER,115, Max Junction Temp=+150°C, Octopart=https://octopart.com/pmeg3010ber%2C115-nexperia-78741454, RoHS=TRUE, Temperature Range High=+150°C
D9 D10 D11 D12 D13 D14: library part CMP-57192-000013-1, "LED RED CLEAR SMD", Case Code (Imperial)=0805, Case Code (Metric)=2012, Color=Red, Current Rating=25mA, Forward Current=20mA, Forward Voltage=1.7V, Lens Color=Colorless, Max Operating Temperature=85°C, Min Operating Temperature=-40°C, Package Quantity=3000, Power Rating=100mW, Approvals=UL, Case/Package=0805, Dominant Wavelength=660nm, Height=1.2mm, Illumination Color=Red, Lead Free="Lead Free", Length=2mm, Lens Style=Clear, Lens Transparency=Clear, Luminous Intensity=25mcd, Mount="Surface Mount", Number of LEDs=1, Number of Pins=2, Packaging="Tape and Reel", RoHS Compliant=Yes, Series=-, Test Current=20mA, Viewing Angle=140°, Voltage Rating=1.7V, Voltage Rating (DC)=1.7V, Wavelength=660nm, Width=1.25mm
J1 J2 J3: library part CMP-1502-02796-3, "Terminal Block, 10MM Pitch, Vertical, Rising Cage Clamp, 12-30 AWG, 2 Pin"
J4: library part STDC14
L1: library part CMP-02424-000712-1, "Commercial Inductors, High Saturation Series 5.6uH 6.3A 37.2mΩ 20%", Case/Package=3232, Current Rating=6.3A, DC Resistance (DCR)=37.2mR, Inductance=5.6uH, Inductance Tolerance=20%, Max DC Current=10A, Max Operating Temperature=125°C, Min Operating Temperature=-55°C, Package Quantity=1000, Self Resonant Frequency=21MHz, Test Frequency=100kHz, Core Material=Ferrite, Depth=8.26mm, Height=3mm, Lead Free="Lead Free", Length=0.34inch, Military Standard=Not, Mount="Surface Mount", Number of Pins=2, Packaging="Tape and Reel", Radiation Hardening=No, Rated Current-Max=6.3A, RMS Current (Irms)=6.3A, RoHS Compliant=Yes, Saturation Current=10A, Series=IHLP-3232CZ-01, Shielding=Shielded, Termination=SMD/SMT, Tolerance=20%, Width=8.18mm
R1 R2: library part CMP-1018-00962-2, "RES Thick Film, 10MΩ, 1%, 1W, 100ppm/°C, 2512", Case/Package=2512, Max Operating Temperature=155°C, Max Power Dissipation=1W, Min Operating Temperature=-55°C, Resistance=10MR, Temperature Coefficient=100ppm/°C, Tolerance=1%, Composition="Thick Film", Features="Automotive AEC-Q200", Height=0.028inch, Lead Free="Lead Free", Length=0.248inch, Number of Terminations=2, Packaging="Tape and Reel", Width=0.124inch
R3 R6 R10 R12 R15 R16 R18 R20 R21 R22 R24 R25 R29 R30: library part CMP-02407-000489-1, "RES 1.05K OHM 0.5% 1/5W 0805", Case Code (Imperial)=0805, Case Code (Metric)=2012, Max Operating Temperature=125°C, Min Operating Temperature=-55°C, Power Rating=125mW, Resistance=100kR, Temperature Coefficient=25ppm/°C, Tolerance=0.1%, Voltage Rating=150V, Case/Package=0805, Composition="Thin Film", Contact Plating=Tin, Depth=1.25mm, Lead Free="Lead Free", Length=2mm, Military Standard=Not, Packaging="Tape and Reel", Radiation Hardening=No, REACH SVHC="No SVHC", Voltage Rating (DC)=150V, Width=1.25mm
R4: library part CMP-2003-04115-2, "RES SMD 47 OHM 1% 1/4W 1206", Manufacturer=Yageo, Package=RT1206, Power Rating=0.25W, Resistance=47Ω, Temperature="-55°C to +155°C", Temperature Coefficient="50 ppm/°C", Temperature Range High=+155°C, Temperature Range Low=-55°C, Tolerance=0.0002, Voltage Rating=200V, Automotive=No, Category=Res, ComponentLink2Description=Datasheet, ComponentLink2URL=http://www.yageo.com/documents/recent/PYu-RT_1-to-0.01_RoHS_L_9.pdf, Composition="Thin Film", Device Class L1="Passive Components", Device Class L2=Resistors, Device Class L3="Chip SMD Resistors", Digikey Description="RES SMD 47 OHM 1% 1/4W 1206", Footprint Url=http://www.yageo.com/exep/pages/download/literatures/PYu-R_Mount_10.pdf, Height=0.65mm, Ipc Land Pattern Name=RESC310160X55, Lead Free=Yes, Manufacturer Part Number=RT1206FRE0747RL, Mouser Description="Thin Film Resistors - SMD 1/4W 47 ohm 1% 50ppm", Octopart=https://octopart.com/rt1206fre0747rl-yageo-1461420, RoHS=TRUE, Series=RT
R5 R7 R11 R13: library part CMP-02407-002899-1, "RES Thick Film, 10MΩ, 1%, 0.125W, 100ppm/°C, 0805", Case/Package=0805, Max Operating Temperature=155°C, Max Power Dissipation=125mW, Min Operating Temperature=-55°C, Package Quantity=20000, Resistance=10MR, Temperature Coefficient=100ppm/°C, Tolerance=1%, Composition="Thick Film", Depth=1.25mm, Features="Automotive AEC-Q200", Height=0.02inch, Lead Free="Lead Free", Length=0.079inch, Military Standard=Not, Number of Terminations=2, Packaging="Tape and Reel", Width=0.049inch
R8: library part CMP-1013-00849-1, "1M 0.125W 1% 0805 (2012 Metric)  SMD", Case-EIA=0805, Case-Metric=2012, Power="0.125 W", Tolerance="1 %", Technology=SMT
R9: library part CMP-03412-007263-1, "RES SMD 3.9K OHM 0.5% 1/8W 0805", Manufacturer=Yageo, Package=RT0805, Power Rating=0.125W, Resistance=3.9KΩ, Temperature="-55°C to +155°C", Temperature Coefficient="25 ppm/°C", Temperature Range High=+155°C, Temperature Range Low=-55°C, Tolerance=0.01, Voltage Rating=150V, Automotive=No, Category=Res, ComponentLink2Description=Datasheet, ComponentLink2URL=http://www.yageo.com/documents/recent/PYu-RT_1-to-0.01_RoHS_L_9.pdf, Composition="Thin Film", Device Class L1="Passive Components", Device Class L2=Resistors, Device Class L3="Chip SMD Resistors", Digikey Description="RES SMD 3.9K OHM 0.5% 1/8W 0805", Footprint Url=http://www.yageo.com/exep/pages/download/literatures/PYu-R_Mount_10.pdf, Height=0.6mm, Ipc Land Pattern Name=RESC200125X50, Lead Free=Yes, Manufacturer Part Number=RT0805DRD073K9L, Octopart=https://octopart.com/rt0805drd073k9l-yageo-1265808, RoHS=TRUE, Series=RT
R14 R17 R19 R23: library part CMP-26527-007472-1, "1MΩ ±1% 0.125W 0805 Thick Film Chip Resistor AEC-Q200 compliant", Case Code (Imperial)=0805, Case Code (Metric)=2012, Max Operating Temperature=155°C, Max Power Dissipation=125mW, Min Operating Temperature=-55°C, Resistance=1MR, Resistor Type="Thick Film", Temperature Coefficient=100ppm/°C, Tolerance=1%, Case/Package=0805, Construction=Rectangular, Contact Plating=Tin, Depth=1.25mm, Features="Automotive AEC-Q200", Height=0.026inch, Lead Free="Lead Free", Length=2mm, Military Standard=Not, Mount="Surface Mount", Number of Terminations=2, Packaging="Tape and Reel", Power Rating=125mW, Radiation Hardening=No, RoHS Compliant=Yes, Series=RMCF, Size Code=0805, Width=0.049inch
R26 R28 R33: library part CMP-2001-01414-1, Manufacturer=Yageo, Part Number=RC0805JR-130RL
R27 R31: library part CMP-03412-025351-1, "RES SMD 22.6KOHM 0.05% 1/8W 0805", Manufacturer=Yageo, Package=RT0805, Power Rating=0.125W, Resistance=22.6KΩ, Temperature="-55°C to +155°C", Temperature Coefficient="25 ppm/°C", Temperature Range High=+155°C, Temperature Range Low=-55°C, Tolerance=0.001, Voltage Rating=150V, Automotive=No, Category=Res, ComponentLink2Description=Datasheet, ComponentLink2URL=http://www.yageo.com/documents/recent/PYu-RT_1-to-0.01_RoHS_L_9.pdf, Composition="Thin Film", Device Class L1="Passive Components", Device Class L2=Resistors, Device Class L3="Chip SMD Resistors", Digikey Description="RES SMD 22.6KOHM 0.05% 1/8W 0805", Footprint Url=http://www.yageo.com/exep/pages/download/literatures/PYu-R_Mount_10.pdf, Height=0.6mm, Ipc Land Pattern Name=RESC200125X50, Lead Free=Yes, Manufacturer Part Number=RT0805WRD0722K6L, Octopart=https://octopart.com/rt0805wrd0722k6l-yageo-71401359, RoHS=TRUE, Series=RT
R32 R34 R35: library part CMP-26527-002739-1, "10kΩ ±1% 0.125W 0805 Thick Film Chip Resistor AEC-Q200 compliant", Case Code (Imperial)=0805, Case Code (Metric)=2012, Max Operating Temperature=155°C, Max Power Dissipation=125mW, Min Operating Temperature=-55°C, Resistance=10kR, Resistor Type="Thick Film", Temperature Coefficient=100ppm/°C, Tolerance=1%, Case/Package=0805, Construction=Rectangular, Contact Plating=Tin, Depth=1.25mm, Features="Automotive AEC-Q200", Height=0.026inch, Length=0.079inch, Military Standard=Not, Mount="Surface Mount", Number of Terminations=2, Packaging="Tape and Reel", Radiation Hardening=No, RoHS Compliant=Yes, Series=RMCF, Width=0.049inch
R36 R37 R38 R39 R40 R41: library part CMP-02407-003516-1, "RES Thick Film, 300Ω, 1%, 0.5W, 100ppm/°C, 0805", Case/Package=0805, Max Operating Temperature=155°C, Max Power Dissipation=500mW, Min Operating Temperature=-55°C, Package Quantity=5000, Power Rating=330mW, Resistance=300R, Temperature Coefficient=100ppm/°C, Tolerance=1%, Composition="Thick Film", Contact Plating=Tin, Features="Automotive AEC-Q200", Height=0.024inch, Lead Free="Lead Free", Length=0.079inch, Mount="Surface Mount", Number of Terminations=2, Packaging="Tape and Reel", Termination=Wraparound, Width=0.049inch
X1: library part CMP-2000-07331-1, "Crystal, 16 MHz, -40 to 85 degC, 4-Pin SMD, RoHS, Tape and Reel", Frequency=16MHz, Frequency Stability=10PPM, Load Capacitance=9pF, Manufacturer=Epson, Operating Temperature Range=-20Cto+75C, Package / Case=3.2mmx2.5mm, Package Description="4-Pin Surface Mount Device, Body 3.2 x 2.5 mm", Package Reference=TSX-3225, Brand=EpsonTiming, Datasheet URL=https://support.epson.biz/td/api/doc_check.php?dl=brief_FA-238V_en.pdf, Datasheet Version=12/2015, Drive Level=200uW, ESR=60Ohms, Factory Pack Quantity=250, Height=0.6mm, Length=3.2mm, Manufacturer URL=https://www.eea.epson.com/, Mounting Style=SMD/SMT, Mounting Technology=SurfaceMount, Packaging=Reel, Product Category=Crystals, RoHS=True, Series=TSX-3225, Termination Style=SMD/SMT, Tolerance=10PPM, Type=Crystal, Unit Weight=0.000564oz, Width=2.5mm

## Free pads (board coordinates)
  round 6 hole 3.2: 2(5.334,94.488) 3(94.615,94.742) 4(94.107,5.207) 5(5.334,5.969)

## Via types
v1: diameter 0.508, hole 0.254, Top Layer to Bottom Layer, 45 vias
v2: diameter 1.27, hole 0.711, Top Layer to Bottom Layer, 6 vias
v3: diameter 0.762, hole 0.508, Top Layer to Bottom Layer, 2 vias

## Nets (pads, with @x,y where several pads share a name; then routed paths per layer and width w, separated by ;. In a path a pad name is that pad's centre, name@x,y a point inside that pad or via, vN(x,y) a via of type N, cw(c..) or ccw(c..) an arc to the next point about the centre after c; other vN are vias at no path point)
+3V3: B3.1 B3.13 B3.19 B3.32 B3.48 B3.64 B4.8 B5.8 C13.1 C15.1 C16.1 C17.1 C20.1 C22.1 C24.1 J4.3 J5.6 R26.1 R28.2 R34.2 R35.2 | length 259.5
  Top Layer w0.254: v1(63.058,61.516) 63.083,61.492 66.46,61.492 v1(66.484,61.468) 66.484,71.686 66.563,71.765 66.563,71.843 66.524,71.882 66.524,72.986 67.501,73.962 v1(78.295,73.962)
  Top Layer w0.3: 41.544,60.119 41.719,60.295 J5.6 ; v1(63.754,47.244) 63.754,29.195 64.501,28.448 67.134,28.448 67.564,28.018 v2(67.564,26.543) v2@67.501,26.606 ; J4.3@76.136,85.011 76.136,85.978 76.312,86.154 v1(79.947,86.154)
  Top Layer w0.762: v1(37.846,79.502) 37.91,79.438 v1(37.91,66.596)
  Bottom Layer w0.254: C20.1 65.042,71.882 v1(66.611,71.882) ; C20.1@64.847,71.549 64.847,71.037 65.391,70.493 B3.32 ; C17.1 78.168,74.158 78.295,74.031 v1(78.295,73.962)
  Bottom Layer w0.3: v1(41.656,60.452) 41.48,60.628 40.64,60.628 40.64,63.281 40.816,63.457 63.058,63.457 ; J5.6@41.978,66.469 J5.6@42.238,66.728 ; v1(63.058,61.516) 63.058,63.457 ; v1(63.754,47.244) 67.112,47.244 R34.2 67.246,47.633 67.246,53.466 67.422,53.642 72.326,53.642 72.581,53.896 72.581,57.279 72.405,57.455 C22.1@71.186,57.455 ; v1(66.484,61.468) 67.379,62.362 71.364,62.362 ; R28.2@67.47,26.647 67.564,26.553 v2(67.564,26.543) ; B3.19 63.422,63.993 63.058,63.629 63.058,63.457 ; C22.1 C22.1@71.186,57.455 ; C22.1@71.183,57.452 C22.1@71.186,57.455 ; B3.48 77.243,75.288 77.567,75.613 C17.1@77.915,75.613 ; C17.1 79.436,75.61 79.692,75.867 79.692,82.677 79.947,82.931 v1(79.947,86.154) ; C16.1 80.406,56.902 80.406,57.579 78.044,57.579 C15.1 77.666,57.582 77.243,58.006 B3.1 77.243,62.484 ; C13.1@82.542,62.913 82.867,62.588 C13.1@82.867,62.278 ; C13.1@82.867,63.04 82.821,62.993 B3.64 77.455,62.993 77.243,62.78 77.243,62.484 ; C22.1@71.186,57.455 71.242,57.511 B3.13 71.242,62.24 71.364,62.362 ; 71.364,62.362 71.486,62.484 77.243,62.484
  Bottom Layer w0.508: J5.6@41.593,66.596 J5.6 J5.6@41.978,66.469
  Bottom Layer w0.762: B5.8 18.569,77.976 18.569,78.64 19.685,79.756 37.592,79.756 v1(37.846,79.502) ; v1(37.91,66.596) J5.6@41.593,66.596
  Bottom Layer w1: B4.8 61.468,26.647 ; R26.1 61.341,26.52 61.468,26.647 ; R28.2@67.47,26.647 61.468,26.647
+20V: B1.3 B2.3 C9.1 C10.1 J3.1 R29.2 | length 75.8
  Top Layer w0.508: v1(84.582,22.908) v1(84.582,17.955) 84.582,13.797 J3.1
  Bottom Layer w0.508: v1(84.582,17.955) R29.2 ; C10.1 84.803,24.142 84.582,23.921 v1(84.582,22.908) B2.3
  Bottom Layer w1.27: C9.1 54.628,11.351 55.372,12.095 ; B1.3 55.372,12.095 ; J3.1 85.25,3.825 84.346,2.921 56.116,2.921 55.372,3.665 55.372,12.095
BOOT0: B3.60 R32.2 | length 11.3
  Bottom Layer w0.254: B3.60 81.957,64.993 82.105,65.142 82.105,66.298 82.254,66.447 88.815,66.447 R32.2
BUSY: B3.34 J5.11 | length 35.1
  Top Layer w0.254: J5.11 45.657,78.026 v1(45.657,81.455)
  Bottom Layer w0.254: J5.11 J5.11@44.323,76.693 ; v1(45.657,81.455) 45.705,81.407 50.419,81.407 56.896,74.93 70.094,74.93 70.242,74.781 B3.34
DIO1: B3.26 J5.3 | length 30
  Bottom Layer w0.254: J5.3 43.243,75.613 50.117,75.613 58.237,67.493 B3.26
DIO2: B3.27 J5.2 | length 31
  Bottom Layer w0.254: J5.2 42.7,77.61 50.264,77.61 52.642,75.232 52.642,74.231 58.88,67.993 B3.27
FENCE: J1.1 R1.1 | length 3.5
  Bottom Layer w1.27: J1.1 10.548,41.276 10.69,41.418 R1.1
FENCE_INEG: B4.6 R6.2 R24.2 | length 21.3
  Bottom Layer w0.508: R24.2 R24.2@21.688,31.887
  Bottom Layer w0.762: R24.2@21.688,31.887 22.225,31.35 B4.6 22.225,25.259 22.798,24.686 R6.2
FENCE_IPOS: B4.3 R3.2 | length 18.3
  Bottom Layer w0.762: B4.3 22.281,21.003 22.281,22.208 22.727,22.654 35.241,22.654 36.068,21.827 R3.2
FENCE_VNEG: B5.6 R12.2 R18.2 | length 13.7
  Bottom Layer w0.762: R18.2 15.748,80.947 16.002,80.693 B5.6 16.002,77.01 16.002,75.932 16.448,75.486 R12.2@22.352,75.486
FENCE_VPOS: B5.3 R10.2 | length 7.6
  Top Layer w0.762: v3(16.002,69.771) 20.955,69.771 v3@21.082,69.898
  Bottom Layer w0.762: v3(16.002,69.771) B5.3
  other v3: 21.209,69.771
GND: B2.1 B3.18 B3.31 B3.47 B3.63 B4.4 B5.4 C3.2 C4.2 C5.2 C6.2 C7.2 C8.2 C9.2 C10.2 C12.2 C13.2 C14.2 C15.2 C16.2 C17.2 C18.2 C19.2 C20.2 C21.2 C22.2 C23.2 C24.2 C25.2 J1.2 J2.2 J3.2 J4.5 J4.7 J4.11 J5.7 R4.2 R5.2 R9.2 R13.1 R14.2 R16.1 R17.2 R19.2 R20.1 R22.1 R23.2 R27.1 R31.1 R32.1 R36.1 R37.1 R38.1 R39.1 R40.1 R41.1 X1.2 X1.4 | length 617.4
  Top Layer w0.254: v1(47.879,66.421) 49.974,64.325 v1(49.974,60.325) ; v1(57.531,61.087) 57.563,61.119 57.563,71.644 v1(57.594,71.676)
  Top Layer w0.5: v1(73.977,45.526) 73.977,48.514 74.358,48.895 v1(77.406,48.895)
  Top Layer w1: 81.915,26.337 v2(81.915,33.401) ; 82.042,13.081 v1(82.042,21.003) v1@82.042,26.21
  Top Layer w1.27: v2(34.163,6.604) 34.417,6.858 81.298,6.858 82.042,7.602 82.042,13.081 ; v2(44.577,22.304) 44.577,57.295 45.321,58.039 49.294,58.039 50.038,58.783 50.038,60.261 v1(49.974,60.325)
  Bottom Layer w0.254: J5.7 44.284,66.445 47.855,66.445 v1(47.879,66.421) ; C25.2 49.599,60.748 C25.2@49.947,61.096 ; v1(57.531,61.087) v1@57.54,61.096 ; v1(57.594,71.676) 58.828,71.676 58.864,71.712 61.746,71.712 C20.2 ; C24.2 60.259,61.096 60.259,60.141 60.407,59.992 64.177,59.992 64.325,60.141 64.325,63.344 64.474,63.493 B3.18 69.906,63.493 70.421,64.008 ; B3.31 70.273,69.993 70.421,69.844 ; C22.2 67.546,54.655 60.96,48.069 60.96,42.545 63.601,39.904 66.378,39.904 66.397,39.923 C21.2 68.003,39.923 68.175,39.751 75.226,39.751 75.374,39.9 75.374,42.799 ; J4.11@71.056,85.011 71.056,87.148 71.205,87.297 75.015,87.297 ; J4.7@73.596,85.011 73.596,86.999 73.745,87.148 74.867,87.148 ; J4.5@74.867,85.011 74.867,87.148 ; 76.136,64.008 76.652,63.493 B3.63 82.089,63.493 82.271,63.675 85.026,63.675 ; 76.689,69.844 76.742,69.898 B3.47 76.742,78.363 76.891,78.512 77.815,78.512 C17.2@77.915,78.413 ; X1.2@77.406,47.206 X1.2 ; C15.2 80.234,54.782 C16.2 85.516,55.003 85.664,55.152 C13.2 ; C17.2 78.168,82.266 78.93,83.028 78.93,87.148 78.782,87.297 75.015,87.297 ; C13.2@85.667,62.405 85.667,62.819 85.606,62.88 85.661,62.935 85.661,63.526 85.513,63.675 85.026,63.675 ; R32.1 91.042,65.221 90.893,65.072 C14.2 84.936,63.766 85.026,63.675 ; 74.867,87.148 75.015,87.297
  Bottom Layer w0.3: 75.374,42.799 81.915,42.799 ; C19.2@80.068,47.032 C19.2@80.073,47.038
  Bottom Layer w0.5: C18.2@72.2,45.526 v1(73.977,45.526) X1.4@75.287,45.526
  Bottom Layer w0.508: 11.43,69.815 11.728,69.517 ; C12.2@71.501,11.988 C12.2 71.374,12.549 C12.2@71.92,13.095 ; X1.2@77.406,47.206 v1(77.406,48.895) 77.406,54.147 77.445,54.186 77.445,54.561 77.666,54.782 C15.2 ; X1.2@77.58,47.032 C19.2@80.068,47.032 ; 78.782,87.297 78.782,87.735 80.073,89.027 92.396,89.027 92.694,88.729 R40.1 92.757,86.805 92.757,72.835 R41.1 ; C19.2@80.073,47.038 81.739,47.038 81.915,46.862 81.915,42.799 v2(81.915,33.401) ; v1(82.042,21.003) 82.047,21.008 85.164,21.008 ; v1(82.169,26.21) 82.278,26.101 84.854,26.101 C10.2 ; B2.1 85.164,21.008 ; J3.2@95.377,13.129 95.25,13.256 95.25,18.161 93.555,19.856 86.316,19.856 85.164,21.008
  Bottom Layer w0.762: 11.43,69.815 R16.1 ; C5.2 10.257,82.595 9.706,83.146 R17.2 9.652,69.815 9.95,69.517 11.728,69.517 14.732,69.517 ; 14.732,67.485 14.732,69.517 ; B5.4 14.732,69.517 ; C25.2@49.947,61.096 v1@57.531,61.096 ; v1@57.54,61.096 C24.2@60.259,61.096
  Bottom Layer w1: 70.421,64.008 73.469,64.008 ; 70.421,69.844 73.469,69.844 ; v2(71.501,6.731) C12.2@71.501,11.988 ; C12.2@71.92,13.095 R31.1 ; 76.136,64.008 73.469,64.008 ; 76.689,69.844 73.469,69.844 ; 73.469,64.008 73.469,69.844
  Bottom Layer w1.016: R14.2@11.43,66.596 11.557,66.723 C4.2
  Bottom Layer w1.27: J1.2@6.586,51.088 5.433,49.936 5.433,34.219 7.775,31.877 10.62,31.877 ; R4.2@14.097,8.049 14.097,9.319 13.081,10.335 13.081,12.515 13.825,13.259 C6.2 R19.2@18.954,13.258 ; R4.2 15.407,6.942 C3.2@17.311,6.942 ; 14.732,67.485 14.605,67.612 8.064,67.612 7.32,66.868 7.32,51.403 J1.2 7.635,51.088 7.635,50.195 8.266,49.563 12.461,49.563 14.986,47.038 38.186,47.038 R5.2 ; R23.2 10.708,31.965 10.62,31.877 ; R23.2@16.034,31.923 C7.2@19.177,31.923 ; R22.1 16.891,21.13 ; C3.2 33.985,6.782 v2(34.163,6.604) ; R19.2 19.558,15.158 20.831,16.431 R20.1 20.917,20.003 20.193,20.727 16.891,20.727 16.891,21.13 ; v2(44.196,6.858) 44.196,12.271 44.275,12.192 44.577,12.192 ; v2(44.577,22.304) R27.1 44.577,12.192 ; C9.2 47.292,12.192 44.577,12.192 ; 10.62,31.877 10.495,31.752 10.495,21.874 11.239,21.13 16.891,21.13
INEG: B3.15 C7.1 D7.1 D8.1 R23.1 R24.1 | length 67.2
  Bottom Layer w0.254: D8.1 38.913,34.722 52.832,48.641 57.308,48.641 68.432,59.765 70.242,59.765 B3.15
  Bottom Layer w0.508: R23.1@15.494,34.298 R23.1@15.643,34.446 ; C7.1@18.52,34.446 C7.1 19.047,34.595 19.047,34.592 19.265,34.374 C7.1@19.268,34.374
  Bottom Layer w0.762: C7.1@19.268,34.374 19.901,33.741 23.403,33.741 D7.1 D8.1
  Bottom Layer w1.27: R23.1@15.643,34.446 C7.1@18.52,34.446
INV_TWO: B4.2 R20.2 R21.1 | length 7.9
  Bottom Layer w0.508: R20.2 R20.2@22.815,16.386 ; R21.1@22.815,13.211 R21.1
  Bottom Layer w0.762: R20.2@22.771,16.656 23.495,17.38 B4.2
  Bottom Layer w1.016: R21.1@22.815,13.211 R20.2@22.815,16.386
INV_TWO_B5: B5.2 R15.1 | length 6.7
  Bottom Layer w0.762: R15.1 17.272,73.327
IPOS: B3.14 C6.1 D5.1 D6.1 R19.1 R21.2 | length 91.8
  Top Layer w0.254: v1(29.083,10.16) 39.37,10.16 42.799,13.589 v1(42.799,36.322)
  Bottom Layer w0.254: v1(29.083,10.16) 29.21,10.287 D5.1 ; v1(42.799,36.322) 53.339,46.862 57.939,46.862 70.743,59.666 B3.14
  Bottom Layer w0.508: R21.2 22.987,11.186 22.987,10.396 ; D6.1@26.098,10.396 D6.1
  Bottom Layer w1.27: 15.621,10.459 C6.1 19.207,10.459 19.504,10.756 R19.1 ; R19.1@19.558,10.396 22.987,10.396 D6.1@26.098,10.396 ; D6.1 D5.1
LED1: B3.50 D13.2 | length 19.8
  Bottom Layer w0.254: B3.50 81.449,69.993 81.597,70.142 81.597,80.701 86.169,85.273 D13.2
LED2: B3.51 D12.2 | length 18.5
  Bottom Layer w0.254: B3.51 81.875,69.493 82.233,69.85 82.233,79.629 85.29,82.687 85.986,82.687 86.159,82.86 D12.2
LED3: B3.52 D11.2 | length 16.4
  Bottom Layer w0.254: B3.52 81.94,68.993 82.236,69.289 82.561,69.289 82.74,69.469 82.74,77.029 86.159,80.447 D11.2
LED4: B3.53 D10.2 | length 14.6
  Bottom Layer w0.254: B3.53 81.979,68.493 82.338,68.852 83.14,68.852 83.376,69.088 83.376,74.87 86.286,77.78 D10.2
LED5: B3.54 D9.2 | length 13
  Bottom Layer w0.254: B3.54 82.017,67.993 82.4,68.375 83.806,68.375 84.138,68.707 84.138,73.092 86.286,75.24 D9.2
LED6: B3.56 D14.2 | length 12.3
  Bottom Layer w0.254: B3.56 81.263,66.993 81.327,66.929 84.772,66.929 85.026,67.183 85.026,71.441 86.286,72.7 D14.2
"MCU VCAP1": B3.30 C23.1 | length 8.3
  Bottom Layer w0.254: C23.1@59.436,69.493 B3.30
"MCU VCAP2": B3.62 C14.1 | length 4.4
  Bottom Layer w0.254: B3.62 81.916,63.993 82.422,64.499 82.738,64.499 83.085,64.847 C14.1
MCU_OSC_IN: B3.5 C18.1 X1.1 | length 17.6
  Bottom Layer w0.254: B3.5@75.243,61.468 B3.5 75.243,47.17 X1.1
  Bottom Layer w0.508: X1.1@75.242,47.17 75.104,47.032 C18.1@72.205,47.032 ; C18.1@72.205,47.032 72.2,47.026 C18.1@72.205,47.032
MCU_OSC_OUT: B3.6 R33.1 | length 10
  Bottom Layer w0.254: R33.1 74.456,51.775 74.729,52.048 74.729,52.188 74.742,52.201 B3.6 B3.6@74.742,61.468
MISO: B3.22 J5.10 | length 27.1
  Bottom Layer w0.254: J5.10 45.617,72.732 46.086,72.263 47.625,72.263 54.395,65.493 B3.22
MOSI: B3.23 J5.4 | length 32.3
  Bottom Layer w0.254: J5.4 43.116,72.946 43.116,74.597 43.624,75.105 44.64,75.105 44.676,75.07 44.681,75.07 45.255,74.495 45.255,74.49 46.848,72.898 48.387,72.898 55.292,65.993 B3.23
NEG_VE_TRIGGER: R5.1 R7.2 | length 1.6
  Bottom Layer w1.27: R7.2 R5.1
NetB1_1: B1.1 R25.1 R27.2 | length 11.8
  Bottom Layer w1.27: R25.1 48.661,18.913 46.939,18.913 46.881,18.971 47.625,19.715 47.625,20.513 48.369,21.257 B1.1
NetB1_2: B1.2 C8.1 R25.2 R26.2 | length 16.6
  Bottom Layer w1.27: C8.1 49.926,15.288 50.67,16.032 50.67,18.844 50.797,18.717 55.552,18.717 55.679,18.59 55.969,18.59 56.096,18.463 59.614,18.463 R26.2
NetB2_2: B2.2 C11.2 L1.2 | length 35.7
  Bottom Layer w0.508: B2.2 80.96,21.958 78.041,24.877 78.041,26.987 78.994,27.94 95.841,27.94 96.139,27.642 C11.2
NetB2_4: B2.4 R30.1 R31.2 | length 25.5
  Top Layer w0.508: v1(92.075,15.669) v1(92.075,22.908)
  Bottom Layer w0.508: 78.613,15.34 R31.2@79.438,15.34 ; R31.2 79.438,15.258 R31.2@79.438,15.34 ; R30.1@79.438,17.689 R30.1 ; B2.4 v1(92.075,22.908) ; v1(92.075,15.669) 91.746,15.34 R31.2@79.438,15.34
  Bottom Layer w1: R31.2@79.438,15.34 R30.1@79.438,17.689
NetB2_5: B2.5 R29.1 | length 11
  Top Layer w0.508: v1(93.345,18.082) v1(93.345,22.019)
  Bottom Layer w0.508: R29.1 89.862,17.955 89.925,18.019 93.281,18.019 v1(93.345,18.082) ; B2.5 93.284,21.958 v1(93.345,22.019)
NetB2_6: B2.6 C11.1 | length 6.4
  Bottom Layer w0.508: B2.6 95.248,21.008 95.765,20.491 C11.1@96.139,20.491
NetC1_1: C1.1 R7.1 | length 1.6
  Bottom Layer w1.27: C1.1 R7.1
NetC1_2: C1.2 C2.1 R2.2 R8.1 | length 15.5
  Top Layer w0.254: v1(27.305,41.783) 27.813,42.291 v1(27.813,50.785)
  Bottom Layer w0.254: v1@27.559,50.785 v1(27.813,50.785)
  Bottom Layer w1.27: R2.2 C1.2 ; C2.1 26.482,50.785 v1@27.559,50.785 ; v1(27.813,50.785) 30.294,50.785 R8.1
NetC2_2: C2.2 R11.2 | length 5.1
  Bottom Layer w1.27: R11.2 22.785,51.61 23.619,50.776 C2.2
NetC3_1: C3.1 J2.1 R3.1 R4.1 R6.1 | length 60.3
  Bottom Layer w1.27: J2.1@10.495,16.384 10.795,16.084 10.795,8.049 10.795,5.509 10.795,4.493 11.684,3.604 17.526,3.604 37.28,3.604 38.024,4.348 38.024,19.098 38.024,21.638 38.036,21.65 38.036,24.674 R6.1
NetC12_1: C12.1 L1.1 R28.1 R30.2 | length 20
  Bottom Layer w0.508: L1.1@69.85,24.813 70.802,25.766 L1.1 L1.1@71.374,25.766 ; C12.1 71.374,19.06 C12.1@71.92,19.606
  Bottom Layer w1: R28.1 L1.1@69.85,24.813 ; C12.1@71.374,19.06 L1.1@71.374,25.766 ; C12.1@71.92,19.606 R30.2
NetD9_1: D9.1 R36.2 | length 2.7
  Bottom Layer w0.254: D9.1 90.654,75.565 R36.2
NetD10_1: D10.1 R37.2 | length 2.9
  Bottom Layer w0.254: D10.1 90.44,78.105 R37.2
NetD11_1: D11.1 R38.2 | length 3.2
  Bottom Layer w0.254: D11.1 87.958,81.097 88.131,81.27 89.188,81.27 89.198,81.28 R38.2
NetD12_1: D12.1 R39.2 | length 3.3
  Bottom Layer w0.254: D12.1 89.994,83.185 90.781,83.973 R39.2
NetD13_1: D13.1 R40.2 | length 3.5
  Bottom Layer w0.254: D13.1 87.969,85.923 88.142,86.096 88.793,86.096 89.565,86.868 R40.2
NetD14_1: D14.1 R41.2 | length 2.9
  Bottom Layer w0.254: D14.1 90.614,73.025 R41.2
NetR1_2: R1.2 R2.1 | length 3.3
  Bottom Layer w1.27: R1.2 16.805,41.641 19.898,41.641 R2.1
NetR8_2: R8.2 R9.1 R10.1 R12.1 | length 32.8
  Bottom Layer w0.762: R10.1 R12.1 R12.1@22.987,73.962
  Bottom Layer w1.27: R10.1 25.926,69.771 26.67,69.027 26.67,56.751 27.414,56.007 31.514,56.007 32.258,55.263 R8.2 32.258,49.149 R9.1@32.304,49.103
NON_INV_FIVE: B4.5 R22.2 | length 5.8
  Bottom Layer w0.762: R22.2@16.764,24.724 16.764,26.083 17.328,26.647 B4.5
NON_INV_FIVE_B5: B5.5 R16.2 | length 9
  Bottom Layer w0.508: 14.605,79.804 14.732,79.677
  Bottom Layer w0.762: R16.2 11.43,79.506 11.728,79.804 14.605,79.804 ; B5.5 14.732,79.677
NRST: B3.7 C21.1 J4.12 R34.1 | length 118.8
  Top Layer w0.254: v1(65.087,45.593) 65.087,37.995 65.236,37.846 87.291,37.846 87.439,37.995 87.439,80.496 87.291,80.645 71.417,80.645 71.056,81.005 v1(71.056,81.074) v1@70.929,81.201
  Bottom Layer w0.254: v1(65.087,45.593) 67.335,45.593 R34.1 ; C21.1 67.373,42.977 R34.1 ; v1(71.056,81.074) J4.12@71.056,83.741 ; B3.7 74.243,53.399 73.343,52.499 69.935,52.499 69.787,52.35 69.787,46.022 69.319,45.554 R34.1
NRST-LORA: C25.1 J5.8 R35.1 | length 13.9
  Top Layer w0.254: J5.8 45.381,69.009 45.529,68.86 v1(45.529,60.246)
  Bottom Layer w0.254: R35.1@43.116,60.674 R35.1 v1(45.529,60.246) 46.672,60.246 C25.1
NSS: B3.20 J5.5 | length 29
  Bottom Layer w0.254: J5.5 42.989,70.279 47.069,70.279 52.855,64.493 B3.20
OUT_ONE: B4.1 D5.2 D6.2 | length 11.4
  Bottom Layer w0.762: 24.765,14.529 B4.1
  Bottom Layer w1.016: 24.765,14.529 D6.2
  Bottom Layer w1.27: D6.2 D5.2
OUT_ONE_B5: B5.1 D1.2 D2.2 | length 10
  Bottom Layer w0.508: D1.2@19.847,67.199 19.974,67.199 D1.2
  Bottom Layer w0.762: 18.542,68.504 B5.1 B5.1@18.542,73.073
  Bottom Layer w1.016: 18.542,68.504 D1.2@19.847,67.199
  Bottom Layer w1.27: D1.2 D2.2
OUT_SEVEN: B4.7 D7.2 D8.2 | length 8.7
  Bottom Layer w0.762: B4.7 23.495,31.033 D7.2 D8.2
OUT_SEVEN_B5: B5.7 D3.2 D4.2 | length 8.6
  Bottom Layer w0.762: B5.7@17.272,77.47 17.272,79.931 18.542,81.201 D4.2
  Bottom Layer w1.016: D4.2 D3.2
POS_VE_TRIGGER: R11.1 R13.2 | length 4.8
  Bottom Layer w1.27: R13.2 16.735,51.737 16.862,51.61 R11.1
RXEN: B3.24 J5.1 | length 34.1
  Top Layer w0.254: v1(47.434,73.867) v1(47.434,78.245)
  Bottom Layer w0.254: J5.1 41.734,79.169 42.707,78.196 43.83,78.196 43.838,78.188 44.681,78.188 44.689,78.196 47.386,78.196 v1(47.434,78.245) ; v1@47.606,73.732 47.471,73.867 v1(47.434,73.867) 47.588,73.714 47.917,73.384 49.171,73.384 56.062,66.493 B3.24
SCK: B3.21 J5.9 | length 26.3
  Bottom Layer w0.254: J5.9 44.338,71.628 46.863,71.628 53.498,64.993 B3.21
SWCLK: B3.49 J4.6 | length 20
  Top Layer w0.254: v1(74.867,81.455) 74.891,81.431 80.684,81.431 v1(80.709,81.407)
  Bottom Layer w0.254: v1(74.867,81.455) J4.6@74.867,83.741 ; B3.49 79.818,70.493 80.454,71.129 80.454,81.131 80.709,81.385 v1(80.709,81.407)
SWDIO: B3.46 J4.4 | length 11.3
  Bottom Layer w0.254: J4.4@76.136,83.741 76.22,83.658 76.22,72.504 B3.46
SWO: B3.55 J4.8 | length 28.1
  Top Layer w0.254: v1(73.724,79.804) 82.338,79.804 82.486,79.655 v1(82.486,67.564)
  Bottom Layer w0.254: J4.8@73.596,83.741 73.66,83.678 73.66,79.868 v1(73.724,79.804) ; B3.55 79.239,67.485 82.211,67.485 v1@82.359,67.634
TXEN: B3.25 J5.12 | length 31.4
  Top Layer w0.254: v1(49.212,74.367) v1(49.212,79.169)
  Bottom Layer w0.254: J5.12 v1(49.212,79.169) ; v1(49.212,74.367) 49.839,74.367 57.213,66.993 B3.25
VCP_RX: B3.43 J4.13 | length 20.4
  Top Layer w0.254: v1(68.389,77.518) 74.544,77.518 74.671,77.645 v1(74.739,77.645)
  Bottom Layer w0.254: v1(68.389,77.518) 68.389,84.862 68.538,85.011 J4.13@69.787,85.011 ; v1(74.739,77.645) 74.739,77.01 74.742,77.007 B3.43
VCP_TX: B3.42 J4.14 | length 15.4
  Bottom Layer w0.254: J4.14@69.787,83.741 69.787,76.524 69.935,76.375 73.829,76.375 74.243,75.961 B3.42
VNEG: B3.17 C5.1 D3.1 D4.1 R17.1 R18.1 | length 91.6
  Top Layer w0.254: v1(36.005,83.36) 36.036,83.328 36.036,61.754 v1(36.068,61.722)
  Bottom Layer w0.127: 65.395,62.919 65.47,62.993
  Bottom Layer w0.254: v1(36.068,61.722) 36.068,57.531 37.719,55.88 61.465,55.88 65.395,59.81 65.395,62.919 ; 65.47,62.993 B3.17
  Bottom Layer w0.508: C5.1@12.551,85.246 C5.1
  Bottom Layer w1.016: R17.1 16.597,85.098 17.018,85.519 17.933,85.519 17.968,85.554 D4.1@18.542,85.554 ; D4.1@18.542,85.519 35.473,85.519 36.068,84.924 36.068,83.424 v1(36.005,83.36)
VPOS: B3.16 C4.1 D1.1 D2.1 R14.1 R15.2 | length 67.7
  Top Layer w0.254: v1(23.241,62.357) v1(28.702,62.357)
  Bottom Layer w0.254: v1(23.241,62.357) D2.1 ; v1(28.702,62.357) 36.83,54.229 61.341,54.229 68.117,61.005 B3.16 B3.16@69.743,60.418